# Altium PCB QCM_hardware_V2.PcbDoc
Units mm, origin at the board's own origin, x right, y up, seen from the top; angles counter-clockwise.
Board outline 160 x 100 mm, 2 copper layers (Top Layer, Bottom Layer), stack 0.78 mm thick; 94 components, 63 nets, 329 pads, 388 vias.
Unrouted connection lines stored in the file: 100.
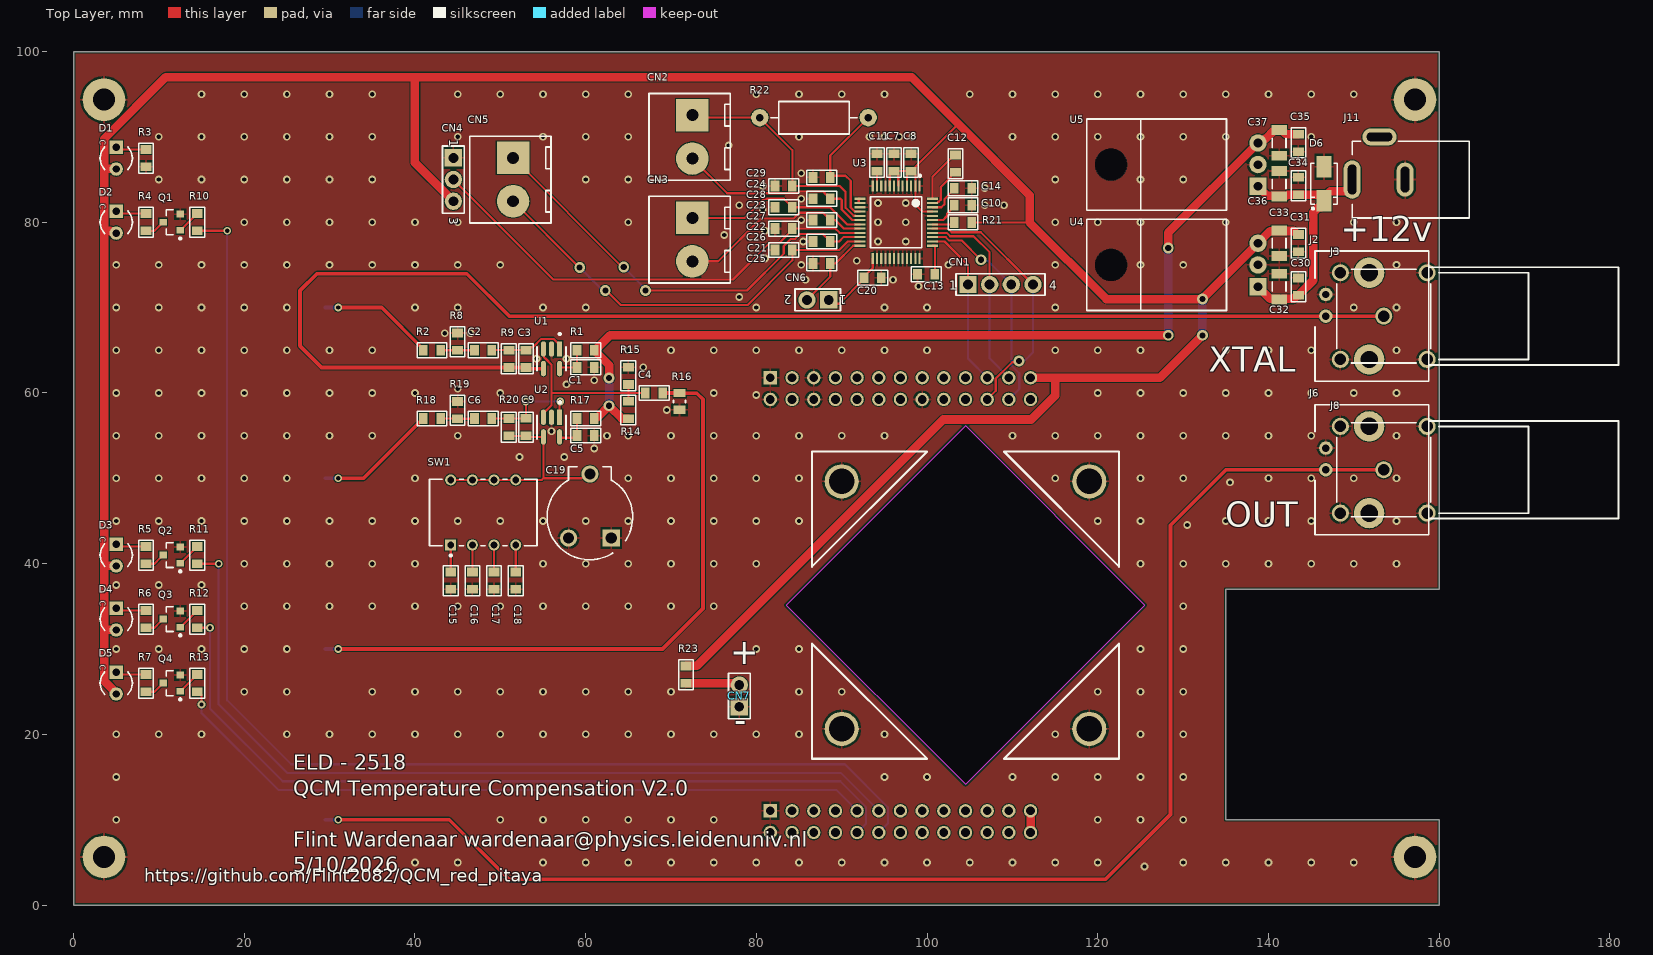
[diagram p0: Top Layer view]
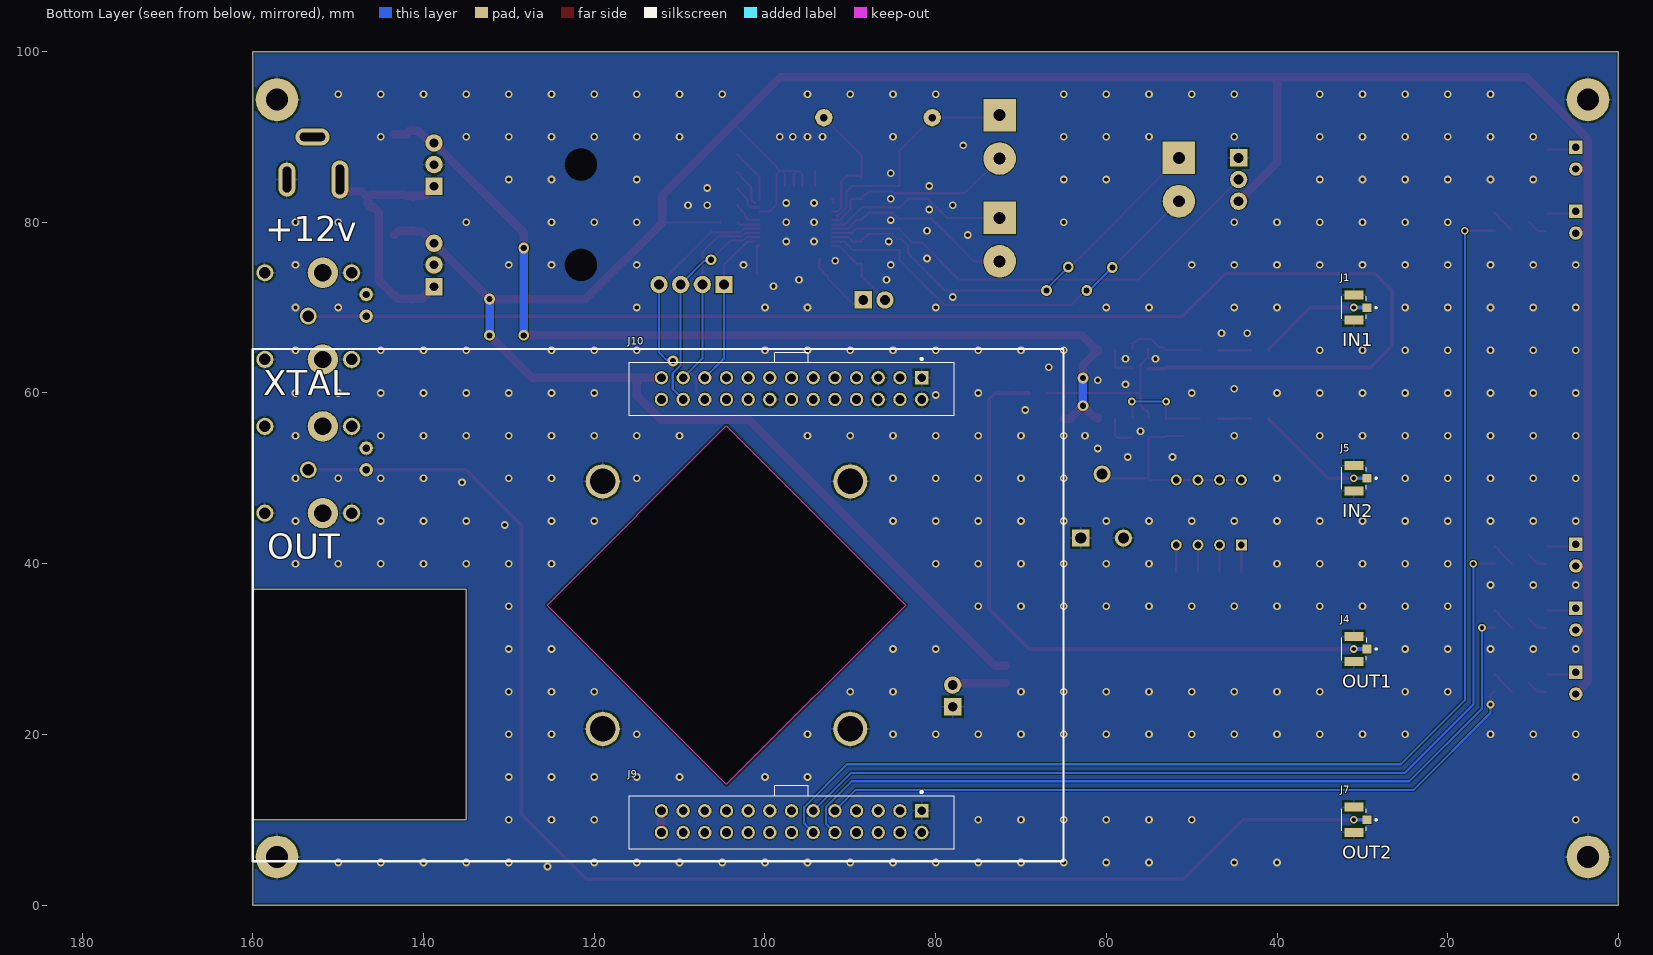
[diagram p1: Bottom Layer view, seen from below]
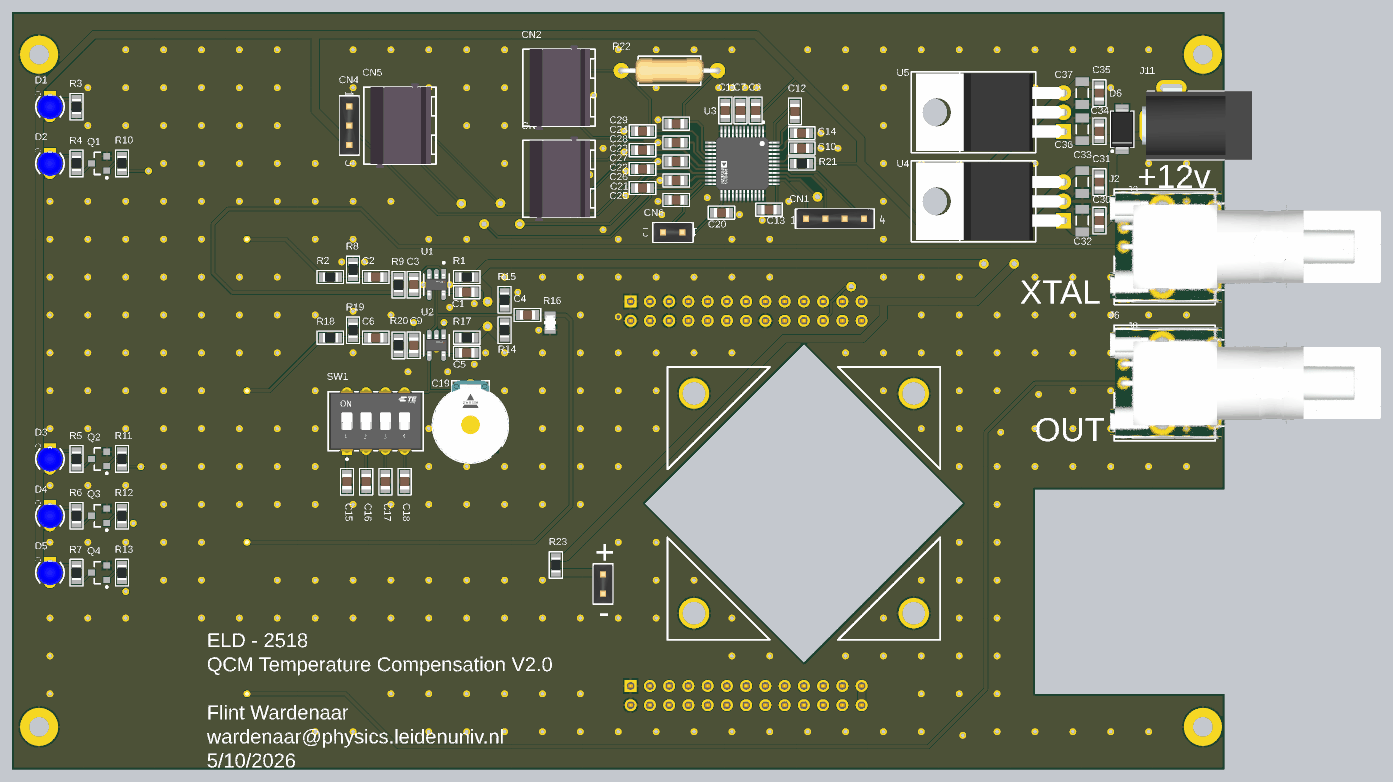
[diagram p2: 3D render of the assembled board from above, using the file's embedded part models]
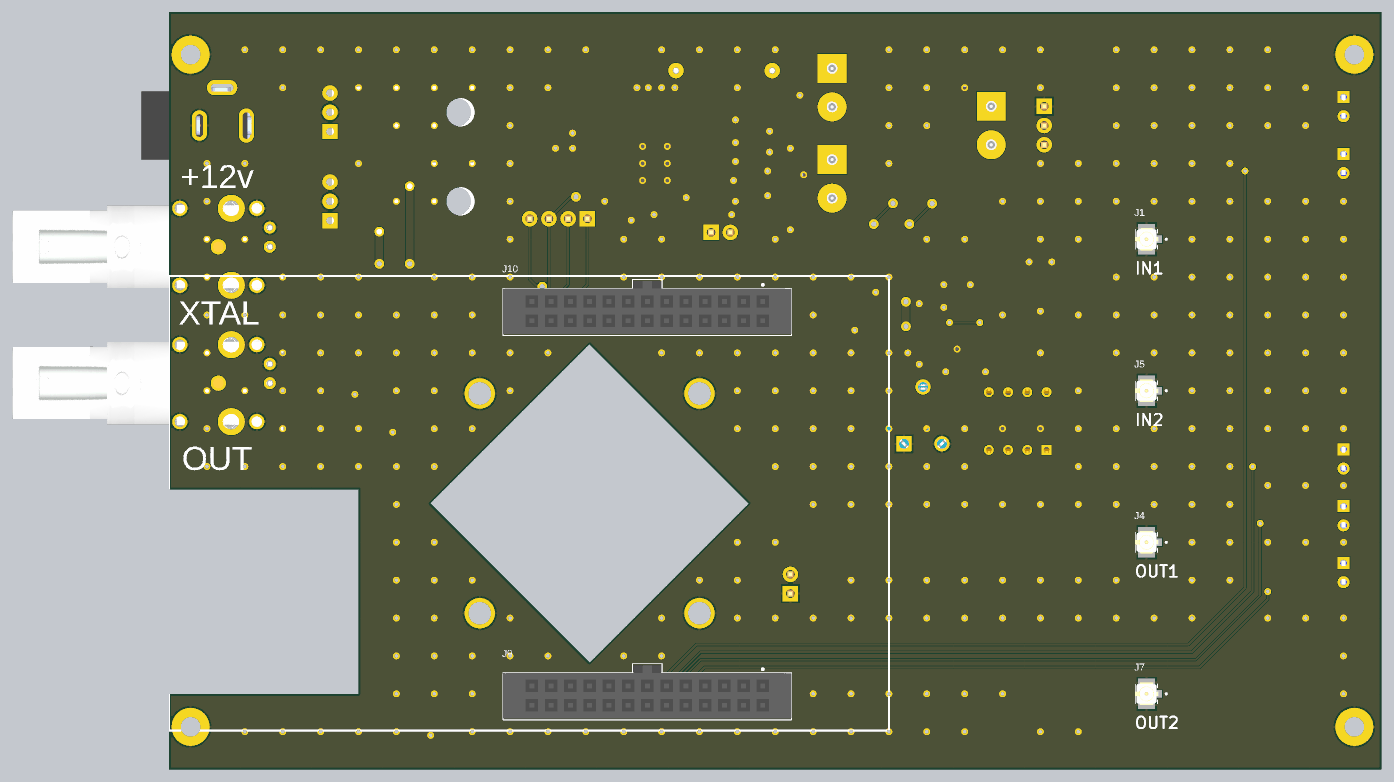
[diagram p3: 3D render of the assembled board from below, using the file's embedded part models]

## Layer stack, top to bottom
Top Solder: solder mask 0.01, Solder Resist, Dk 3.5
Top Layer: signal copper 0.035
Dielectric2: core 0.71, FR-4, Dk 4.3
Bottom Layer: signal copper 0.035
Bottom Solder: solder mask 0.01, Solder Resist, Dk 3.5

## Board outline
0,0 0,100 160,100 160,37 135,37 135,10 160,10 160,0
cut-out: 104.5,14.14 125.5,35.14 104.5,56.14 83.5,35.14

## Design rules (kind name [scope] priority, off if disabled: settings)
AssemblyTestPointUsage [All] p1 off:
AssemblyTestpoint [All] p1 off: testpointundercomponent=TRUE minsize=1.016 maxsize=2.54 preferedsize=1.524 minholesize=0 maxholesize=1.016 preferedholesize=0.813 testpointgrid=0.025 usegrid=TRUE gridtolerance=0 allowsidetop=TRUE allowsidebottom=TRUE
BoardOutlineClearance [All] p1: gap=0.25 ignorepadtopadclearanceinfootprint=FALSE except(0: Arc-SplitContinuation Track-SplitContinuation SMDPad-SplitContinuation THPad-SplitContinuation Via-SplitContinuation Fill-SplitContinuation Poly-SplitContinuation Region-SplitContinuation Text-SplitContinuation)
Clearance Clearance-xPP-xTP-xTT [All] p1: gap=0.1 ignorepadtopadclearanceinfootprint=TRUE except(0.01: Fill-Hole Poly-Hole Region-Hole Text-Hole; 0.2: Arc-Arc Arc-Track Arc-Hole Track-Track Track-Hole SMDPad-Hole THPad-Hole Via-Hole)
ComponentClearance Ignore_Shared_Connector_Collision [InComponent('J6') vs InComponent('J8')] p1 off: gap=0 collisioncheckmode=3 verticalgap=0 showdistances=FALSE
ComponentClearance [All] p2 off: gap=0.25 collisioncheckmode=3 verticalgap=0.25 showdistances=FALSE
DiffPairsRouting DiffPairs100Routing-BGA_Rooms [WithinRoom('BGA_Room_FPGA','BGA_Room_FX3','BGA_Room_ADC_Hotlink','BGA_Room_STM_Hotlink') And InNetClass('DIFF_100_PAIRS')] p1: maxlimit=0.127 minlimit=0.127 mostfreqgap=0.127 toplayer_minwidth=0.198 toplayer_maxwidth=0.198 toplayer_prefwidth=0.198 bottomlayer_minwidth=0.198 bottomlayer_maxwidth=0.198 bottomlayer_prefwidth=0.198 impedanceprofiledriven=TRUE maxuncoupledlength=12.7
DiffPairsRouting [All] p2: maxlimit=0.254 minlimit=0.254 mostfreqgap=0.254 toplayer_minwidth=0.381 toplayer_maxwidth=0.381 toplayer_prefwidth=0.381 bottomlayer_minwidth=0.381 bottomlayer_maxwidth=0.381 bottomlayer_prefwidth=0.381 maxuncoupledlength=12.7
DiffPairsRouting DiffPairs90Routing-BGA_Rooms [WithinRoom('BGA_Room_FX3') And InNetClass('DIFF_90_PAIRS')] p3: maxlimit=0.127 minlimit=0.127 mostfreqgap=0.127 toplayer_minwidth=0.198 toplayer_maxwidth=0.198 toplayer_prefwidth=0.198 bottomlayer_minwidth=0.198 bottomlayer_maxwidth=0.198 bottomlayer_prefwidth=0.198 maxuncoupledlength=12.7
DiffPairsRouting DiffPairs100Routing [InDifferentialPairClass('DIFF_PAIRS_100')] p4: maxlimit=0.127 minlimit=0.127 mostfreqgap=0.127 toplayer_minwidth=0.198 toplayer_maxwidth=0.198 toplayer_prefwidth=0.198 bottomlayer_minwidth=0.198 bottomlayer_maxwidth=0.198 bottomlayer_prefwidth=0.198 impedanceprofiledriven=TRUE maxuncoupledlength=12.5
DiffPairsRouting DiffPairs90Routing [InDifferentialPairClass('DIFF_PAIRS_90')] p5: maxlimit=0.127 minlimit=0.127 mostfreqgap=0.127 toplayer_minwidth=0.198 toplayer_maxwidth=0.198 toplayer_prefwidth=0.198 bottomlayer_minwidth=0.198 bottomlayer_maxwidth=0.198 bottomlayer_prefwidth=0.198 maxuncoupledlength=12.5
FabricationTestPointUsage [All] p1 off: valid=0 allowmultiple=FALSE
FabricationTestpoint [All] p1 off: side=3 testpointundercomponent=TRUE minsize=1.016 maxsize=2.54 preferedsize=1.524 minholesize=0 maxholesize=1.016 preferedholesize=0.813 testpointgrid=0.025 allowsidetop=TRUE allowsidebottom=TRUE usegrid=TRUE gridtolerance=0
Height [All] p1: minheight=0 maxheight=25 prefheight=12.5
HoleSize HoleSize-PTH [All] p2: absolutevalues=TRUE maxlimit=7 minlimit=0.15 maxpercent=80.000 minpercent=20.000
HoleToHoleClearance [All] p1: gap=0.35 allowstackedmicrovias=TRUE
MatchedLengths ADC_Hotlink_TX [InNetClass('Hotlink_ADCBUS_TX')] p1: tolerance=25.4 checknetsindiffpair=FALSE checkdiffpairvsdiffpair=TRUE checkxsignals=TRUE checkothers=TRUE usedelayunits=TRUE delaytolerance=150.000000
MatchedLengths STM_Hotlink_RX [InNetClass('Hotlnik_STMBUS_RX')] p2: tolerance=25.4 checknetsindiffpair=FALSE checkdiffpairvsdiffpair=TRUE checkxsignals=TRUE checkothers=TRUE usedelayunits=TRUE delaytolerance=150.000000
MatchedLengths STM_Hotlink_TX [InNetClass('Hotlink_STMBUS_TX')] p3: tolerance=25.4 checknetsindiffpair=FALSE checkdiffpairvsdiffpair=TRUE checkxsignals=TRUE checkothers=TRUE usedelayunits=TRUE delaytolerance=150.000000
MatchedLengths ADC_Hotlink_RX [InNetClass('Hotlink_ADCBUS_RX')] p4: tolerance=25.4 checknetsindiffpair=FALSE checkdiffpairvsdiffpair=TRUE checkxsignals=TRUE checkothers=TRUE usedelayunits=TRUE delaytolerance=150.000000
MatchedLengths MatchLengths_xSignals_U9_U6 [InxSignalClass('xSignals_U9_U6_MatchLengthsClass')] p5: tolerance=15 checknetsindiffpair=FALSE checkdiffpairvsdiffpair=TRUE checkxsignals=TRUE checkothers=TRUE targetsourcename="Not defined"
MatchedLengths SRAM_BUS [InNetClass('SRAM_BUS')] p6: tolerance=12.7 checknetsindiffpair=FALSE checkdiffpairvsdiffpair=TRUE checkxsignals=TRUE checkothers=TRUE usedelayunits=TRUE delaytolerance=75.000000 targetsourcename="Not defined"
MatchedLengths FX3_GPIF_BUS [InNetClass('FX3_GPIF_BUS')] p7: tolerance=12.7 checknetsindiffpair=FALSE checkdiffpairvsdiffpair=TRUE checkxsignals=TRUE checkothers=TRUE targetsourcename="Not defined"
MinimumAnnularRing "Minimum IAR  >0.24mm" [((ObjectKind = 'Pad') OR (ObjectKind = 'Via')) And (Layer = 'MultiLayer') And (HoleDiameter > AsMM(0.24))] p1: minimumring=0.125 // minimum inner annular ring for pads > 0.45mm finished hole size
MinimumAnnularRing "Minimum IAR <=0.24mm" [((ObjectKind = 'Pad') OR (ObjectKind = 'Via')) And (Layer = 'MultiLayer') And (HoleDiameter <= AsMM(0.24))] p2: minimumring=0.1 // minimum inner annular ring for pads <= 0.45mm finished hole size
MinimumSolderMaskSliver [All] p1: minsoldermaskwidth=0.08
PlaneClearance PlaneClearance-IPI [All] p2: clearance=0.25
PlaneConnect [All] p1: planeconnectstyle=Relief reliefexpansion=0.25 reliefentries=4 reliefconductorwidth=0.25 reliefairgap=0.25
PolygonConnect [All] p1: connectstyle=Relief reliefconductorwidth=0.254 reliefentries=4 polygonreliefangle="90 Angle" airgapwidth=0.254
PolygonConnect PolygonConnect-xTW [All] p2: thpad.connectstyle=Relief thpad.reliefconductorwidth=0.25 thpad.reliefentries=4 thpad.polygonreliefangle="90 Angle" thpad.airgapwidth=0.25 smdpad.connectstyle=Relief smdpad.reliefconductorwidth=0.25 smdpad.reliefentries=2 smdpad.polygonreliefangle="0 Angle" smdpad.airgapwidth=0.25 via.connectstyle=Relief via.reliefconductorwidth=0.25 via.reliefentries=4 via.polygonreliefangle="90 Angle" via.airgapwidth=0.25
RoutingCorners RoutingCorners_HighSpeed [InDifferentialPairClass('All Differential Pairs')] p1: cornerstyle=Round minsetback=2.54 maxsetback=2.54
RoutingCorners [All] p2: cornerstyle=Round minsetback=2.5 maxsetback=2.5
RoutingLayers RoutingLayers_DiffPairs [InDifferentialPairClass('All Differential Pairs')] p1: top layer_v5=TRUE bottom layer_v5=TRUE
RoutingLayers RoutingLayers_Power [InNetClass('POWER')] p2: top layer_v5=TRUE bottom layer_v5=TRUE
RoutingLayers [InNetClass('All Nets')] p3: top layer_v5=TRUE bottom layer_v5=TRUE
RoutingVias [All] p1: holewidth=0.711 width=1.27 viastyle="Through Hole" minholewidth=0.711 minwidth=1.27 maxholewidth=0.711 maxwidth=1.27
RoutingVias "Routing VIAs BGA_Rooms" [WithinRoom('BGA_Room_FPGA','BGA_Room_FX3','BGA_Room_ADC_Hotlink','BGA_Room_STM_Hotlink')] p2 off: holewidth=0.254 width=0.457 viastyle="Through Hole" minholewidth=0.254 minwidth=0.457 maxholewidth=0.254 maxwidth=0.457 useviatemplates=TRUE viatemplateguid#1={D2D23EF5-C6DB-44D0-AA98-324992E46AC0} viatemplatename#1=via_r45h10_mm
RoutingVias "Routing VIAs" [All] p3 off: holewidth=0.254 width=0.457 viastyle="Through Hole" minholewidth=0.254 minwidth=0.457 maxholewidth=0.762 maxwidth=1.575 useviatemplates=TRUE viatemplateguid#1={93411B78-2348-4F15-A81C-0014E3455A4D} viatemplateguid#2={6A946846-BB7C-48EE-9F70-67F61FD11D76} viatemplatename#1=via_r50h15_mm viatemplatename#2=via_r90h50_mm // Standard VIAs
SMDNeckDown [All] p1: percent=100.000
SilkToSilkClearance [All] p1: silktosilkclearance=0.05
SilkToSolderMaskClearance SilkscreenOverComponentPads [IsPad] p2: minsilkscreentomaskgap=0.1 clearancetoexposedcopper=TRUE
SolderMaskExpansion [All] p1: expansion=0 istentingtop=FALSE
SupplyNets "Schematic Supply Nets_5" [InNet('+12')] p1: voltage=0.000
SupplyNets "Schematic Supply Nets_4" [InNet('GND')] p2: voltage=0.000
SupplyNets "Schematic Supply Nets_3" [InNet('-4v')] p3: voltage=0.000
SupplyNets "Schematic Supply Nets_2" [InNet('3v3')] p4: voltage=0.000
SupplyNets "Schematic Supply Nets_1" [InNet('+5')] p5: voltage=0.000
SupplyNets "Schematic Supply Nets" [InNet('+9')] p6: voltage=0.000
UnRoutedNet [All] p1: checkbadconnections=TRUE
Width Width-BGA_Rooms [WithinRoom('BGA_Room_FPGA','BGA_Room_FX3','BGA_Room_ADC_Hotlink','BGA_Room_STM_Hotlink')] p1: maxlimit=0.5 minlimit=0.1 preferedwidth=0.1
Width Width-Power [InNetClass('Power')] p2: maxlimit=10 minlimit=0.254 preferedwidth=1 minimp=50.000000 maximp=50.000000 favimp=50.000000
Width Width-50ohm [InNetClass('50ohm')] p3: maxlimit=0.5 minlimit=0.406 preferedwidth=0.433 bottomlayer_minwidth=0.406 minimp=50.000000 maximp=50.000000 favimp=50.000000
Width [All] p4: maxlimit=1 minlimit=0.254 preferedwidth=0.254 minimp=50.000000 maximp=50.000000 favimp=50.000000
Width Width-xTW [All] p5: maxlimit=0.2 minlimit=0.15 preferedwidth=0.15
16 further rules are at their usual default settings.

## Classes and differential pairs
net class 50ohm: NetC3_2 NetC4_1 NetJ1_1 NetJ5_1 NetJ6_1
net class Power: 3v3 +5 +9 +12 -4v GND

## Components (designator, comment, footprint, x,y, rotation, side; value= is the part's Value field where it differs from the comment)
C1 "100nF" C_0805 60,63 r0 top
C2 "100nF" C_0805 48,65 r180 top
C3 "330p" C_0805 53,64 r270 top
C4 "22uF" C_0805 68.016,60 r180 top
C5 "100nF" C_0805 60,55 r0 top
C6 "100nF" C_0805 48,57 r180 top
C7 "10uF" C_0805 96.13,87 r90 top
C8 "0.1uF" C_0805 98.13,87 r90 top
C9 "330p" C_0805 53,56 r270 top
C10 "10uF" C_0805 104.207,81.984 r0 top
C11 "10uF" C_0805 94.13,87 r270 top
C12 "10uF" C_0805 103.315,86.868 r270 top
C13 "10uF" C_0805 99.9,73.9 r0 top
C14 "10uF" C_0805 104.207,83.984 r0 top
C15 "180pF" C_0805 44.19,38 r270 top
C16 "100pf" C_0805 46.73,38 r270 top
C17 "47pF" C_0805 49.27,38 r270 top
C18 "22pF" C_0805 51.81,38 r270 top
C19 "0-33pF" FP-BFC280832659-MFG 60.5,45.5 r180 top value=5.5-65pF
C20 "0.1uF" C_0805 93.63,73.5 r0 top
C21 "0.1uF" C_0805 83.2,76.75 r180 top
C22 "0.1uF" C_0805 83.2,79.25 r180 top
C23 "0.1uF" C_0805 83.2,81.75 r180 top
C24 "0.1uF" C_0805 83.2,84.25 r180 top
C25 "0.1uF" C_0805 87.645,75.17 r180 top
C26 "0.1uF" C_0805 87.645,77.75 r180 top
C27 "0.1uF" C_0805 87.645,80.25 r180 top
C28 "0.1uF" C_0805 87.645,82.75 r180 top
C29 "0.1uF" C_0805 87.645,85.25 r180 top
C30 "100pF" C_0805 143.5,72.46 r270 top
C31 "100pF" C_0805 143.5,77.54 r90 top
C32 "100nF" CAPC1206(3216)170_N 141.25,72.46 r270 top value=68nF
C33 "100nF" CAPC1206(3216)170_N 141.25,77.54 r90 top value=68nF
C34 "100pF" C_0805 143.5,84.25 r270 top
C35 "100pF" C_0805 143.5,89.29 r90 top
C36 "100nF" CAPC1206(3216)170_N 141.25,84.5 r270 top value=68nF
C37 "100nF" CAPC1206(3216)170_N 141.25,89.29 r90 top value=68nF
CN1 "SPI" HDR4 108.6,72.7 r0 top
CN2 "RTD-" TERMINAL_BLOCK2 72.5,90 r270 top
CN3 "RTD+" TERMINAL_BLOCK2 72.5,77.96 r270 top
CN4 "TSic 501F" HDR3 44.5,85 r270 top
CN5 "THERMOCOUPLE" TERMINAL_BLOCK2 51.5,85 r270 top
CN6 "SPARE" HDR2 87.2,70.9 r180 top
CN7 "FAN" HDR2 78,24.5 r90 top
D1 "LED_BLUE" LED_3MM_BLUE 5,87.5 r270 top
D2 "LED_BLUE" LED_3MM_BLUE 5,80 r270 top
D3 "LED_BLUE" LED_3MM_BLUE 5,41 r270 top
D4 "LED_BLUE" LED_3MM_BLUE 5,33.5 r270 top
D5 "LED_BLUE" LED_3MM_BLUE 5,26 r270 top
D6 "DIODE_TVS" DIODE_SMA 146.5,84.5 r90 top
J1 "IN1" UFL_JACK_SM 31,70 r90 bottom
J2 "BNC_ELBOW2" BNC_ELBOW2 149.25,69 r270 top
J3 "60711002241505" 60711002241505 153.5,69 r0 top
J4 "OUT1" UFL_JACK_SM 31,30 r90 bottom
J5 "IN2" UFL_JACK_SM 31,50 r90 bottom
J6 "BNC_ELBOW2" BNC_ELBOW2 149.25,51 r270 top
J7 "OUT2" UFL_JACK_SM 31,10 r90 bottom
J8 "60711002241505" 60711002241505 153.5,51 r0 top
J9 "SFH11-PBPC-D13-ST-BK" SFH11-PBPC-D13-ST-BK_MFG 96.88,9.77 r0 bottom
J10 "SFH11-PBPC-D13-ST-BK" SFH11-PBPC-D13-ST-BK_MFG 96.88,60.51 r0 bottom
J11 "KLDX-0202-B" KYCN-KLDX-0202-B_V 163.5,85 r180 top
Q1 "MGSF1N03LT1G" ONSC-SOT-23-3-318-08_V 11.5,80 r180 top
Q2 "MGSF1N03LT1G" ONSC-SOT-23-3-318-08_V 11.5,41 r180 top
Q3 "MGSF1N03LT1G" ONSC-SOT-23-3-318-08_V 11.5,33.5 r180 top
Q4 "MGSF1N03LT1G" ONSC-SOT-23-3-318-08_V 11.5,26 r180 top
R1 "10" R_0805 60,65 r180 top
R2 "50" R_0805 42,65 r180 top
R3 "220" R_0805 8.5,87.5 r270 top
R4 "220" R_0805 8.5,80 r270 top
R5 "220" R_0805 8.5,41 r270 top
R6 "220" R_0805 8.5,33.5 r270 top
R7 "220" R_0805 8.5,26 r270 top
R8 "100k" R_0805 45,66 r90 top
R9 "390k" R_0805 51,64 r90 top
R10 "1k" R_0805 14.5,80 r90 top
R11 "1k" R_0805 14.5,41 r90 top
R12 "1k" R_0805 14.5,33.5 r90 top
R13 "1k" R_0805 14.5,26 r90 top
R14 "10k" R_0805 65,58 r90 top
R15 "10k" R_0805 65,62 r90 top
R16 "CRCW080550R0FKTA" FP-D12-CRCW0805-MFG 71,59 r90 top
R17 "10" R_0805 60,57 r180 top
R18 "50" R_0805 42,57 r180 top
R19 "100k" R_0805 45,57.984 r90 top
R20 "390k" R_0805 51,55.984 r90 top
R21 "0" R_0805 104.207,79.984 r180 top
R22 "R_SENSE" R_AXIAL_9.0x3.2mm_p12.7mm 86.75,92.25 r0 top
R23 "0" R_0805 71.766,27 r90 top
SW1 "1825360-3" FP-1825360-3-MFG 48,46 r0 top
U1 "OPA656NB/250" FP-DBV0005A-IPC_A 56,64 r270 top
U2 "OPA656NB/250" FP-DBV0005A-IPC_A 56,56 r270 top
U3 "LTC2986ILX-1#PBF" FP-LX-48-05-08-1760-MFG 96.38,80 r270 top
U4 "Recom R-78K5.0-2.0L" TO220H 130.25,75 r180 top
U5 "7809" TO220H 130.25,86.75 r180 top

## Footprints (in the part's own frame and the unit in brackets; to place one, negate y for a bottom-side part, rotate by r counter-clockwise, add the part's x,y. Pads: shape width x height; smd on the part's side, far side on the other; paste and mask are expansions set on the pad)
60711002241505 [mm]
  round 2 hole 1.35: 1(0,0) 2(-5.08,5.08) 3(5.08,5.08) 4(5.08,-5.08) 5(-5.08,-5.08)
  silkscreen extent -5.5,-5.5 16.96,5.5, body extent -5.5,-5.5 16.96,5.5, height 18.7
BNC_ELBOW2 [mil]
  round 62 hole 34: 1(0,-100) 2(-100,-100)
  round 140 hole 80: " "(-200,100) " "(200,100)
  silkscreen extent -300,-150 300,1250, body extent -291,-171 291,1237, height 634
C_0805 [mil]
  rect 40x50 smd: 1(-40,0) 2(40,0)
  silkscreen extent -69,-34 69,34, body extent -39,-25 39,25, height 49
CAPC1206(3216)170_N [mm] "Chip Capacitor, Body 3.2x1.6mm, Height 1.7mm, IPC Medium Density"
  rect 1.15x1.8 smd: 1(-1.5,0) 2(1.5,0)
  silkscreen extent -0.55,-0.8 0.55,0.8, body extent -1.7,-0.9 1.7,0.9, height 1.7
DIODE_SMA [mm] "DO-214AC Diode"
  rect 2.5x1.7 smd: A(2,0) C(-2,0)
  silkscreen extent -3.02,-1.55 2.4,1.55, body extent -2.8,-1.48 2.8,1.48, height 2.7
FP-1825360-3-MFG [mm]
  rect 1.29x1.29 hole 0.79 paste-2539.97 mask+0: 1(-3.81,-3.81)
  round 1.29 hole 0.79 paste-2539.97 mask+0: 2(-1.27,-3.81) 3(1.27,-3.81) 4(3.81,-3.81) 5(3.81,3.81) 6(1.27,3.81) 7(-1.27,3.81) 8(-3.81,3.81)
  silkscreen extent -6.29,-5.16 6.3,3.9, body extent -6.4,-4.55 6.4,4.55, height 0.25
FP-BFC280832659-MFG [mm]
  rect 2x2 hole 1.3 paste-2539.97 mask+0: 1(-2.5,2.5)
  round 2 hole 1.3 paste-2539.97 mask+0: 2(2.5,2.5) 3(0,-5)
  silkscreen extent -5.01,-5.85 5.02,5.04, body extent -5.4,-6.1 5.4,5.2, height 0.25
FP-D12-CRCW0805-MFG [mm]
  rect 0.95x1.45 smd paste+0 mask+0: 1(-0.975,0) 2(0.975,0)
  silkscreen extent -0.13,-0.7 0.13,0.7, body extent -1.55,-0.82 1.55,0.82, height 0.25
FP-DBV0005A-IPC_A [mm]
  rect 1.805x0.612 smd paste+0 mask+0: 1(-1.15,0.95)
  rrect100% 1.805x0.612 smd paste+0 mask+0: 2(-1.15,0) 3(-1.15,-0.95) 4(1.15,-0.95) 5(1.15,0.95)
  silkscreen extent -3.03,-1.7 1.4,1.7, body extent -2.55,-1.95 2.55,1.95, height 0.25
FP-LX-48-05-08-1760-MFG [mm]
  rect 1.3x0.25 smd paste+0 mask+0: 1(-4.25,2.75) 2(-4.25,2.25) 3(-4.25,1.75) 4(-4.25,1.25) 5(-4.25,0.75) 6(-4.25,0.25) 7(-4.25,-0.25) 8(-4.25,-0.75) 9(-4.25,-1.25) 10(-4.25,-1.75) 11(-4.25,-2.25) 12(-4.25,-2.75) 25(4.25,-2.75) 26(4.25,-2.25) 27(4.25,-1.75) 28(4.25,-1.25) 29(4.25,-0.75) 30(4.25,-0.25) 31(4.25,0.25) 32(4.25,0.75) 33(4.25,1.25) 34(4.25,1.75) 35(4.25,2.25) 36(4.25,2.75)
  rect 0.25x1.3 smd paste+0 mask+0: 13(-2.75,-4.25) 14(-2.25,-4.25) 15(-1.75,-4.25) 16(-1.25,-4.25) 17(-0.75,-4.25) 18(-0.25,-4.25) 19(0.25,-4.25) 20(0.75,-4.25) 21(1.25,-4.25) 22(1.75,-4.25) 23(2.25,-4.25) 24(2.75,-4.25) 37(2.75,4.25) 38(2.25,4.25) 39(1.75,4.25) 40(1.25,4.25) 41(0.75,4.25) 42(0.25,4.25) 43(-0.25,4.25) 44(-0.75,4.25) 45(-1.25,4.25) 46(-1.75,4.25) 47(-2.25,4.25) 48(-2.75,4.25)
  silkscreen extent -5.57,-3 3,3, body extent -4.5,-4.5 4.5,4.5, height 1.6
HDR2 [mil] "2-Pin 1-Row Header With 2.54mm pitch"
  rect 80x80 hole 45.28: 1(-50,0)
  round 80 hole 45.28: 2(50,0)
  silkscreen extent -105,-50 105,50, body extent -101,-50 101,50, height 323
HDR3 [mil] "3-Pin 1-Row Header With 2.54mm pitch"
  rect 80x80 hole 45.28: 1(-100,0)
  round 80 hole 45.28: 2(0,0) 3(100,0)
  silkscreen extent -155,-50 155,50, body extent -150,-50 150,50, height 323
HDR4 [mil] "4-Pin 1-Row Header With 2.54mm pitch"
  rect 80x80 hole 45.28: 1(-150,0)
  round 80 hole 45.28: 2(-50,0) 3(50,0) 4(150,0)
  silkscreen extent -205,-50 205,50, body extent -200,-50 200,50, height 323
KYCN-KLDX-0202-B_V [mm] "3 Conductor Jack, 9 x 14.5 mm Body"
  oval 2x4.5 hole 1 slot 3.5 at 90 deg: 1(13.7,0)
  oval 2x4 hole 1 slot 3 at 90 deg: 2(7.5,0)
  oval 4x2 hole 1 slot 3 at 0 deg: 3(10.5,-5)
  silkscreen extent 0,-4.5 13.7,4.5, body extent -0.15,-5 14.35,4.5, height 11
LED_3MM_BLUE [mil] "Blue 3MM LED"
  round 62 hole 34: A(50,0)
  rect 62x62 hole 34: C(-50,0)
  silkscreen extent -53,-75 53,75, body extent -61,-65 66,65, height 196
ONSC-SOT-23-3-318-08_V [mm] "SOT23, 3-Leads, Body 2.92x1.3mm, Pitch 0.95mm"
  rect 0.9x0.8 smd: 1(-1,0.95) 2(-1,-0.95) 3(1,0)
  silkscreen extent -1.13,-1.46 0.65,2.02, body extent -0.65,-1.46 0.65,1.46, height 1.11
R_0805 [mil] "R 0805"
  rect 40x50 smd: 1(-40,0) 2(40,0)
  silkscreen extent -69,-34 69,34, body extent -39,-24 39,24, height 18
R_AXIAL_9.0x3.2mm_p12.7mm [mil]
  round 80 hole 34: 1(-250,0) 2(250,0)
  silkscreen extent -200,-75 200,75, body extent -263,-63 264,63, height 126
SFH11-PBPC-D13-ST-BK_MFG [mm] "Recommended Land Pattern"
  rect 1.57x1.57 hole 1.02 paste-2539.97 mask+0: 1(-15.24,-1.27)
  round 1.57 hole 1.02 paste-2539.97 mask+0: 2(-15.24,1.27) 3(-12.7,-1.27) 4(-12.7,1.27) 5(-10.16,-1.27) 6(-10.16,1.27) 7(-7.62,-1.27) 8(-7.62,1.27) 9(-5.08,-1.27) 10(-5.08,1.27) 11(-2.54,-1.27) 12(-2.54,1.27) 13(0,-1.27) 14(0,1.27) 15(2.54,-1.27) 16(2.54,1.27) 17(5.08,-1.27) 18(5.08,1.27) 19(7.62,-1.27) 20(7.62,1.27) 21(10.16,-1.27) 22(10.16,1.27) 23(12.7,-1.27) 24(12.7,1.27) 25(15.24,-1.27) 26(15.24,1.27)
  silkscreen extent -19.05,-4.2 19.05,3.2, body extent -19.05,-4 19.05,3, height 8.7
TERMINAL_BLOCK2 [mil] "TERMINAL_BLOCK2"
  rect 150x150 hole 55: 1(-100,0)
  round 150 hole 55: 2(100,0)
  silkscreen extent -200,-200 200,175, body extent -220,-165 220,150, height 394
TO220H [mil] "TO220H"
  rect 80x80 hole 40: 1(-335,100)
  round 80 hole 40: 2(-335,0) 3(-335,-100)
  round 0 hole 147 unplated: " "(342.52,0)
  silkscreen extent -190,-210 455,210, body extent -345,-202 432,202, height 175
UFL_JACK_SM [mm]
  rect 1x1.05 smd: 1(0,-1.525)
  rect 1.05x2.2 smd: 2(-1.475,0) 3(1.475,0)
  silkscreen extent -1.3,-2.7 1.3,1.42, body extent -1.5,-1.55 1.5,1.55, height 1.3

## Part data
C1 C2 C3 C4 C5 C6 C7 C8 C9 C10 C11 C12 C13 C14 C15 C16 C17 C18 C20 C21 C22 C23 C24 C25 C26 C27 C28 C29 C30 C31 C34 C35: library part C_0805
C19: library part CMP-02422-000001-1, "CAP TRIMMER 5.5-65PF 150V TH", Capacitance=5.5-65pF, Manufacturer="Vishay BC Components", Manufacturer Part Number=BFC280832659, Temperature="-40°C to +70°C", Temperature Coefficient=+300/-700ppm/°C, Temperature Range High=+70°C, Temperature Range Low=-40°C, Voltage Rating=150V, Automotive=No, Category=Cap, ComponentLink2Description=Datasheet, ComponentLink2URL=https://www.vishay.com/docs/28528/bfc2808-10mm.pdf, Device Class L1="Passive Components", Device Class L2=Capacitors, Device Class L3="Trimmer / Variable Capacitors", Digikey Description="CAP TRIMMER 5.5-65PF 150V TH", Height=11mm, Lead Free=Yes, Material=Polypropylene, Mouser Description="Trimmer / Variable Capacitors TRIMMER CAPACITOR", Octopart=https://octopart.com/bfc280832659-vishay-41937824, Package=BFC280832659, RoHS=TRUE
C32 C33 C36 C37: library part CMP-1037-04098-1, "CAP 68nF 100V ±5% 1206 (3216 Metric) Thickness 1.7mm SMD", Case-EIA=1206, Case-Metric=3216, Rated Voltage="100 V", Tolerance=Â±5%, Max Thickness="1.7 mm", Technology=SMT
CN1: library part HDR4
CN2 CN3 CN5: library part TERMINAL_BLOCK2
CN4: library part HDR3
CN6 CN7: library part HDR2
J1 J4 J5 J7: library part UFL_JACK_SM, "U.FL (UMCC) Connector Jack, Male Pin 50Ohm Surface Mount Solder", Package=None, Availability=Unavailable, Check_prices=https://www.snapeda.com/parts/CONUFL001-SMD-T/Linx/view-part/?ref=eda, MF=Linx, MP=CONUFL001-SMD-T, Price=None, SnapEDA_Link=https://www.snapeda.com/parts/CONUFL001-SMD-T/Linx/view-part/?ref=snap
J3 J8: library part CMP-03913-162524349-1, "Rf Conn, Bnc, R/a Jack, 50 Ohm, Tht Rohs Compliant: Yes"
J9 J10: library part CMP-00595-18674420-1, "Conn Socket Strip F 26 POS 2.54mm Solder ST Thru-Hole", Color=Black, Contact Resistance=20mΩ, Current Rating=3A, Insulation Resistance=1GΩ, Max Operating Temperature=105°C, Min Operating Temperature=-40°C, ComponentLink2Description="Datasheet URL", ComponentLink2URL=https://drawings-pdf.s3.amazonaws.com/11160.pdf, Connector Type="Header, Socket", Contact Gender=Female, Contact Plating=Gold, HelpURL=https://drawings-pdf.s3.amazonaws.com/11160.pdf, Introduction Date=2011-09-15, Lead Free="Lead Free", Lifecycle Status=Production, Mount="Through Hole", Number of Pins=26, Number of Positions=26, Number of Rows=2, Pitch=2.54mm, REACH SVHC=Yes, RoHS=Compliant, Row Spacing=2.54mm, Terminal Pitch=2.54mm, Termination=Solder
J11: library part CMP-0256-00001-1, "3 Conductor Power Jack, 2 break 2 aux contacts", ComponentLink1Description="Manufacturer URL", ComponentLink1URL=http://kycon.com/, ComponentLink2Description=Datasheet, ComponentLink2URL=http://anacapa.kycon.com/Catalog_PDF/KLDX_0202.pdf, Contact Finish=Brass, Mounting Technology="Through Hole", PackageDescription="Jack, 9 x 14.5 mm Body, 2.5 mm Center Pin Diameter", PackageReference=KLDX-0202-B, PartNumber=KLDX-0202-B
Q1 Q2 Q3 Q4: library part CMP-1058-00778-1, "Power MOSFET, 30 V, 2.1 A, Single N-Channel, 3-Pin SOT-23, Pb-Free, Tape and Reel", Manufacturer="On Semiconductor", Package Type=SOT-23-3, Channel Polarity="N Channel", Ciss Typ (pF)=140, ComponentLink1Description="Manufacturer URL", ComponentLink1URL=http://www.onsemi.com/, ComponentLink2Description=Datasheet, ComponentLink2URL=http://www.onsemi.cn/pub_link/Collateral/MGSF1N03LT1-D.PDF, ComponentLink3Description="Package Specification", ComponentLink3URL=http://www.onsemi.cn/pub_link/Collateral/318-08.PDF, Configuration=Single, Coss Typ (pF)=100, Crss Typ (pF)=40, DatasheetVersion="Rev. 10", ID Max (A)=2.1, Mounting Technology="Surface Mount", PackageDescription="3-Pin Small Outline Transistor, Body 2.92 x 1.3 mm, Pitch 0.95 mm", PackageReference=SOT-23-3-318-08, PackageVersion="Rev. AP, 11/2009", Packing="Tape and Reel", PartNumber=MGSF1N03LT1G, RoHS=Pb-Free, V(BR)DSS Min (V)=30, VGS Max (V)=20, VGS(th) Max (V)=2.4
R1 R2 R3 R4 R5 R6 R7 R8 R9 R10 R11 R12 R13 R14 R15 R17 R18 R19 R20 R21 R23: library part R_0805
R16: library part CMP-00030-21390498-1, "CRCW080550R0FKTA Res Thick Film 0805 50 Ohm 1% 0.125W(1/8W) ±100ppm/C Pad SMD Automotive T/R", Case Code (Imperial)=0805, Case Code (Metric)=2012, Max Operating Temperature=155°C, Min Operating Temperature=-55°C, Power Rating=125mW, Resistance=50Ω, Temperature Coefficient=100ppm/°C, Tolerance=1%, Voltage Rating=150V, Case/Package=0805, Composition="Thick Film", Contact Plating="Lead, Tin", Height=450µm, Lead Free="Contains Lead", Length=2mm, NexarPartId=21390498, RoHS=Non-Compliant, Weight=5.499807mg, Width=1.25mm
R22: library part R_1W, "Throughhole resistor with a 12.7mm pitch (Standard 1W metalfilm/carbon)"
SW1: library part CMP-03400-000022-1, "SWITCH SLIDE DIP SPST 100MA 24V", Contact Current Rating=1A, Contact Resistance=50mR, Flammability Rating="UL94 V-0", Housing Color=Black, Max Current Rating=100mA, Max Operating Temperature=85°C, Max Voltage Rating (DC)=24V, Min Operating Temperature=-30°C, Package Quantity=35, Voltage Rating (DC)=5V, Actuator Length=0.99mm, Actuator Material=Polybutylene, Actuator Type=Standard, Contact Material="Copper Alloy", Contact Plating=Gold, Contact Post Length=4mm, Depth=7.49mm, Electrical Life=1000Cycles, ELV=Compliant, Height=0.138inch, Housing Material=Polyphenylene, Lead Free="Lead Free", Length=0.476inch, Mount="Through Hole", Number of Circuits=4, Number of Positions=4, Orientation=Straight, Packaging=Rail/Tube, Pitch=0.1inch, Radiation Hardening=No, RoHS Compliant=Yes, Sealable="No (Without)", Series=ADE, Terminal Pitch=2.54mm, Termination="PC Pins", Throw Configuration=SPST, Type=Switch, Washable=Yes
U1 U2: library part CMP-0018-00414-3, "IC OPAMP VFB 1 CIRCUIT SOT23-5", Case/Package=SOT-23, Dual Supply Voltage=5V, Input Bias Current=20pA, Input Offset Voltage (Vos)=600uV, Max Dual Supply Voltage=6V, Max Operating Temperature=85°C, Max Supply Voltage=12V, Min Operating Temperature=-40°C, Min Supply Voltage=10V, Nominal Supply Current=16mA, Package Quantity=250, Power Supply Rejection Ratio (PSRR)=74dB, Bandwidth=230MHz, Common Mode Rejection Ratio=88dB, Gain Bandwidth Product=230MHz, Height=1.15mm, Lead Free="Lead Free", Length=2.9mm, Max I/O Voltage=600uV, Number of Amplifiers=1, Number of Channels=1, Number of Circuits=1, Number of Elements=1, Number of Pins=5, Operating Supply Voltage=12V, Packaging="Tape and Reel", Radiation Hardening=No, REACH SVHC="No SVHC", Settling Time=16ns, Slew Rate=290V/µs, Unity Gain Bandwidth Product=230MHz, Width=1.6mm
U3: library part CMP-09131-000069-1, "IC SENSOR TEMP MEASUREMNT 48LQFP", Case/Package=LQFP, Max Supply Voltage=5.25V, Min Operating Temperature=-40°C, Min Supply Voltage=2.85V, Supplier Part Number 1="TSIC 501F TO92", Number of Pins=48, REACH SVHC="No SVHC", RoHS Compliant=Yes, Supplier 1=Farnell
U4: library part 7809, "Standard +9V 1A positive fixed voltage regulator in TO-220 housing", Case/Package=TO, Dropout Voltage=2V, Manufacturer 1=STMicroelectronics, Manufacturer Part Number 1=L7809CV, Max Input Voltage=35V, Max Operating Temperature=125°C, Max Output Current=1.5A, Min Input Voltage=11V, Min Operating Temperature=0°C, Min Output Voltage=9V, Package Quantity=50, Power Supply Rejection Ratio (PSRR)=55dB, Quiescent Current=8mA, Supplier Part Number 1=511-L7809CV, Tolerance=5%, Accuracy=2%, ComponentLink1Description=http://www.jameco.com/Jameco/Products/ProdDS/902071.pdf, ComponentLink1URL=http://www.jameco.com/Jameco/Products/ProdDS/902071.pdf, ComponentLink2Description=http://www.ti.com/lit/ds/symlink/lm7805c.pdf, ComponentLink2URL=http://www.ti.com/lit/ds/symlink/lm7805c.pdf, ComponentLink3Description=http://www.ti.com/general/docs/lit/getliterature.tsp?genericPartNumber=LM7815C&&fileType=pdf, ComponentLink3URL=http://www.ti.com/general/docs/lit/getliterature.tsp?genericPartNumber=LM7815C&&fileType=pdf, ComponentLink4Description=https://datasheet.ciiva.com/27055/1991694-27055797.pdf?src-supplier=Jameco, ComponentLink4URL=https://datasheet.ciiva.com/27055/1991694-27055797.pdf?src-supplier=Jameco, ComponentLink5Description=https://datasheet.ciiva.com/26331/179191-da-01-en-spannungsregler-l7809cv-to-220-stm-26331022.pdf?src-supplier=Conrad, ComponentLink5URL=https://datasheet.ciiva.com/26331/179191-da-01-en-spannungsregler-l7809cv-to-220-stm-26331022.pdf?src-supplier=Conrad, ComponentLink6Description=https://datasheet.ciiva.com/1511/1805459-1511921.pdf?src-supplier=Element14, ComponentLink6URL=https://datasheet.ciiva.com/1511/1805459-1511921.pdf?src-supplier=Element14, ComponentLink7Description=https://datasheet.ciiva.com/2044/cd00000444-2044161.pdf?src-supplier=Digi-Key, ComponentLink7URL=https://datasheet.ciiva.com/2044/cd00000444-2044161.pdf?src-supplier=Digi-Key, ComponentLink8Description=https://datasheet.ciiva.com/16393/cd00000444-16393733.pdf?src-supplier=Future+Electronics, ComponentLink8URL=https://datasheet.ciiva.com/16393/cd00000444-16393733.pdf?src-supplier=Future+Electronics, ComponentLink9Description=https://datasheet.ciiva.com/3224/cd00000444-3224953.pdf?src-supplier=Avnet, ComponentLink9URL=https://datasheet.ciiva.com/3224/cd00000444-3224953.pdf?src-supplier=Avnet, ComponentLink10Description=https://datasheet.ciiva.com/18404/70013895-18404043.pdf?src-supplier=Allied+Electronics, ComponentLink10URL=https://datasheet.ciiva.com/18404/70013895-18404043.pdf?src-supplier=Allied+Electronics, Description 1="STMICROELECTRONICS - L7809CV - IC, V REG +9.0V, 7809, TO-220-3", Height=14.9mm, Lead Free="Lead Free", Length=10.4mm, Mount="Through Hole", Nominal Output Voltage=9V, Number of Outputs=1, Number of Pins=3, Number of Regulators=1, Output Configuration=Positive, Output Current=1.5A, Output Type=Fixed,Adjustable, Output Voltage=9V, Packaging=Rail/Tube, Polarity=Positive, Pricing="1=0.45, 10=0.374, 50=0.374, 100=0.228, 1000=0.176, 2000=0.15, 10000=0.14, 25000=0.133, 50000=0.13, 100000=0.125 (USD)", Radiation Hardening=No, REACH SVHC="No SVHC", RoHS=Yes, Stock 1=8768, Supplier 1=Mouser, Weight=0.01lb, Width=4.6mm
U5: "Standard +9V 1A positive fixed voltage regulator in TO-220 housing", Case/Package=TO, Dropout Voltage=2V, Manufacturer 1=STMicroelectronics, Manufacturer Part Number 1=L7809CV, Max Input Voltage=35V, Max Operating Temperature=125°C, Max Output Current=1.5A, Min Input Voltage=11V, Min Operating Temperature=0°C, Min Output Voltage=9V, Package Quantity=50, Power Supply Rejection Ratio (PSRR)=55dB, Quiescent Current=8mA, Supplier Part Number 1=511-L7809CV, Tolerance=5%, Accuracy=2%, ComponentLink1Description=http://www.jameco.com/Jameco/Products/ProdDS/902071.pdf, ComponentLink1URL=http://www.jameco.com/Jameco/Products/ProdDS/902071.pdf, ComponentLink2Description=http://www.ti.com/lit/ds/symlink/lm7805c.pdf, ComponentLink2URL=http://www.ti.com/lit/ds/symlink/lm7805c.pdf, ComponentLink3Description=http://www.ti.com/general/docs/lit/getliterature.tsp?genericPartNumber=LM7815C&&fileType=pdf, ComponentLink3URL=http://www.ti.com/general/docs/lit/getliterature.tsp?genericPartNumber=LM7815C&&fileType=pdf, ComponentLink4Description=https://datasheet.ciiva.com/27055/1991694-27055797.pdf?src-supplier=Jameco, ComponentLink4URL=https://datasheet.ciiva.com/27055/1991694-27055797.pdf?src-supplier=Jameco, ComponentLink5Description=https://datasheet.ciiva.com/26331/179191-da-01-en-spannungsregler-l7809cv-to-220-stm-26331022.pdf?src-supplier=Conrad, ComponentLink5URL=https://datasheet.ciiva.com/26331/179191-da-01-en-spannungsregler-l7809cv-to-220-stm-26331022.pdf?src-supplier=Conrad, ComponentLink6Description=https://datasheet.ciiva.com/1511/1805459-1511921.pdf?src-supplier=Element14, ComponentLink6URL=https://datasheet.ciiva.com/1511/1805459-1511921.pdf?src-supplier=Element14, ComponentLink7Description=https://datasheet.ciiva.com/2044/cd00000444-2044161.pdf?src-supplier=Digi-Key, ComponentLink7URL=https://datasheet.ciiva.com/2044/cd00000444-2044161.pdf?src-supplier=Digi-Key, ComponentLink8Description=https://datasheet.ciiva.com/16393/cd00000444-16393733.pdf?src-supplier=Future+Electronics, ComponentLink8URL=https://datasheet.ciiva.com/16393/cd00000444-16393733.pdf?src-supplier=Future+Electronics, ComponentLink9Description=https://datasheet.ciiva.com/3224/cd00000444-3224953.pdf?src-supplier=Avnet, ComponentLink9URL=https://datasheet.ciiva.com/3224/cd00000444-3224953.pdf?src-supplier=Avnet, ComponentLink10Description=https://datasheet.ciiva.com/18404/70013895-18404043.pdf?src-supplier=Allied+Electronics, ComponentLink10URL=https://datasheet.ciiva.com/18404/70013895-18404043.pdf?src-supplier=Allied+Electronics, Description 1="STMICROELECTRONICS - L7809CV - IC, V REG +9.0V, 7809, TO-220-3", Height=14.9mm, Lead Free="Lead Free", Length=10.4mm, Mount="Through Hole", Nominal Output Voltage=9V, Number of Outputs=1, Number of Pins=3, Number of Regulators=1, Output Configuration=Positive, Output Current=1.5A, Output Type=Fixed,Adjustable, Output Voltage=9V, Packaging=Rail/Tube, Polarity=Positive, Pricing="1=0.45, 10=0.374, 50=0.374, 100=0.228, 1000=0.176, 2000=0.15, 10000=0.14, 25000=0.133, 50000=0.13, 100000=0.125 (USD)", Radiation Hardening=No, REACH SVHC="No SVHC", RoHS=Yes, Stock 1=8768, Supplier 1=Mouser, Weight=0.01lb, Width=4.6mm

## Free pads (board coordinates)
  round 4 hole 3: 2(119,49.64) 3(90,49.64) 4(90,20.64) 5(119,20.64)
  round 5 hole 2.6: 6(3.57,5.64) 7(3.57,94.36) 8(157.16,94.36) 9(157.16,5.64)

## Via types
v1: diameter 0.9, hole 0.5, Top Layer to Bottom Layer, 376 vias
v2: diameter 1.27, hole 0.711, Top Layer to Bottom Layer, 12 vias

## Nets (pads, with @x,y where several pads share a name; then routed paths per layer and width w, separated by ;. In a path a pad name is that pad's centre, name@x,y a point inside that pad or via, vN(x,y) a via of type N, cw(c..) or ccw(c..) an arc to the next point about the centre after c; other vN are vias at no path point)
3v3: J9.25 J9.26 | length 2.6
  Top Layer w1: J9.25 112.12,8.63 J9.26@112.25,8.5
+5: C7.1 C8.1 C31.2 C33.2 CN4.3 D1.A D2.A D3.A D4.A D5.A J10.25 R21.1 R23.2 U3.2 U3.4 U3.6 U3.8 U3.45 U4.3 | length 361
  Top Layer w0.254: U3.8 95.63,85.603 96.011,85.984 C7.1@96.249,85.984 ; U3.6 96.63,85.603 C7.1@96.249,85.984 ; U3.4 97.63,85.603 98.011,85.984 C8.1 ; C8.1@98.249,85.984 98.63,85.603 U3.2 98.63,82.07 99.45,81.25 U3.45 ; 103.661,91.515 98.638,86.492 98.638,86.365 98.257,85.984 C8.1 ; R21.1 112.016,79.984 ; C7.1@96.249,85.984 C8.1
  Top Layer w1: D5.A 5,24.847 3.613,26.234 3.613,32.484 ; D4.A 4.949,32.281 3.816,32.281 3.613,32.484 ; D3.A 3.883,39.73 3.613,40 ; D2.A 4.89,78.84 4.484,78.84 4.324,79 3.613,79 ; D1.A 4.949,86.281 3.816,86.281 3.613,86.484 ; CN4.3 40,86.96 40,97 ; R23.2 71.773,28.023 73.023,28.023 101.89,56.89 112.209,56.89 115,59.681 115,61.78 ; J10.25 115,61.78 ; v2(132.25,66.75) 127.28,61.78 115,61.78 ; C31.2 143.373,78.556 142.956,78.973 141.317,78.973 C33.2 141.175,78.965 140.184,78.965 U4.3 132.25,71.031 v2(132.25,71) 121,71 112.016,79.984 112.016,83.161 103.661,91.515 98.177,97 40,97 ; 3.613,32.484 3.613,40 ; 3.613,40 3.613,79 ; 3.613,79 3.613,86.484 ; 3.613,86.484 3.613,89.806 10.807,97 40,97
  Bottom Layer w1: v2(132.25,66.75) v2(132.25,71)
+9: C35.2 C37.2 R1.1 R14.1 R17.1 U5.3 | length 113
  Top Layer w1: R17.1 61.016,57.127 61.024,57.135 61.385,57.135 v2(62.75,58.5) 64.258,56.992 64.992,56.992 R14.1 ; R1.1 61.016,64.873 61.024,64.865 61.151,64.865 62.75,63.266 v2(62.75,61.75) ; R1.1@61.016,65.127 61.024,65.135 61.245,65.135 62.86,66.75 v2(128.25,66.75) ; v2(128.25,77) 128.25,78.781 U5.3 139.038,89.29 139.554,89.806 139.7,89.806 140.609,90.715 141.175,90.715 C37.2 141.575,90.79 142.059,90.306 C35.2
  Bottom Layer w1: v2(62.75,58.5) v2(62.75,61.75) ; v2(128.25,66.75) v2(128.25,77)
+12: C30.2 C32.2 C34.2 C36.2 D6.C J11.1 U4.1 U5.1 | length 30.9
  Top Layer w1: U4.1 140.184,71.035 141.175,71.035 C32.2 ; U5.1 139.894,83.075 141.175,83.075 C36.2 141.325,83.075 142.077,83.075 142.236,83.234 142.802,83.234 C34.2 ; C32.2@141.575,70.96 141.642,71.027 142.956,71.027 143.373,71.444 C30.2 ; C34.2 146.166,83.234 146.5,82.9 147.207,83.607 149.338,83.607 149.8,84.069 J11.1 ; C30.2@143.627,71.444 143.635,71.452 143.635,71.579 145.25,73.194 145.25,81.164 145.836,81.75 146.15,81.75 146.5,82.1 D6.C
-4v: J10.26
CS: CN1.4 J10.22 U3.41 | length 30.9
  Top Layer w0.254: U3.41 100.632,79.248 102.463,79.248 102.891,78.821 106.289,78.821 CN1.4 ; J10.22 108.052,60.252 108.052,61.683 109.97,63.601 110.601,63.601 v2(110.75,63.75)
  Bottom Layer w0.254: v2(110.75,63.75) 110.884,63.884 111.545,63.884 112.41,64.749 CN1.4
GND: C1.2 C5.2 C7.2 C8.2 C10.2 C11.1 C13.1 C14.2 C15.2 C16.2 C17.2 C18.2 C19.1 C19.2 C20.2 C21.2 C22.2 C23.2 C24.2 C25.2 C26.2 C27.2 C28.2 C29.2 C30.1 C31.1 C32.1 C33.1 C34.1 C35.1 C36.1 C37.1 CN4.1 CN7.1 D6.A J1.2 J1.3 J2.2 J3.2 J3.3 J3.4 J3.5 J4.2 J4.3 J5.2 J5.3 J6.2 J7.2 J7.3 J8.2 J8.3 J8.4 J8.5 J9.1 J9.2 J10.1 J10.2 J10.5 J10.6 J10.16 J11.2 pad.2 pad.3 pad.4 pad.5 pad.6 pad.7 pad.8 pad.9 Q1.2 Q2.2 Q3.2 Q4.2 R3.2 R8.2 R15.2 R16.1 R19.2 U1.2 U2.2 U3.1 U3.3 U3.5 U3.7 U3.9 U3.12 U3.15 U3.26 U3.27 U3.28 U3.29 U3.30 U3.31 U3.32 U3.33 U3.34 U3.35 U3.36 U3.44 U4.2 U5.2
  other v1: 125.479,4.521 40,5 45,5 55,5 60,5 65,5 70,5 75,5 80,5 85,5 90,5 95,5 100,5 105,5 110,5 115,5 120,5 130,5 135,5 140,5 145,5 150,5 5,10 50,10 55,10 60,10 65,10 70,10 75,10 120,10 125,10 130,10 5,15 95,15 100,15 110,15 115,15 120,15 125,15 130,15 5,20 10,20 15,20 25,20 30,20 35,20 40,20 45,20 50,20 55,20 60,20 65,20 70,20 75,20 80,20 85,20 95,20 115,20 125,20 130,20 20,25 25,25 35,25 40,25 45,25 50,25 55,25 60,25 65,25 70,25 85,25 90,25 120,25 125,25 130,25 5,30 10,30 15,30 20,30 25,30 80,30 85,30 125,30 130,30 20,35 25,35 30,35 35,35 40,35 45,35 50,35 55,35 60,35 65,35 70,35 75,35 130,35 5,37.5 10,37.5 15,37.5 20,40 25,40 30,40 35,40 40,40 55,40 60,40 65,40 70,40 75,40 80,40 125,40 130,40 135,40 140,40 145,40 150,40 155,40 130.479,44.521 5,45 10,45 15,45 20,45 25,45 30,45 35,45 40,45 45,45 50,45 55,45 60,45 65,45 70,45 75,45 80,45 85,45 120,45 125,45 135,45 140,45 145,45 155,45 135.479,49.521 5,50 10,50 15,50 20,50 25,50 40,50 65,50 70,50 75,50 80,50 85,50 115,50 125,50 130,50 140,50 145,50 150,50 155,50 52.25,52.5 57.5,52.5 61,53.5 5,55 10,55 15,55 20,55 25,55 30,55 35,55 45,55 62.5,55 65,55 70,55 75,55 80,55 85,55 90,55 95,55 110,55 115,55 120,55 125,55 130,55 135,55 140,55 145,55 155,55 56,55.5 69.5,58 80,59.75 5,60 10,60 15,60 20,60 25,60 30,60 35,60 40,60 50,60 75,60 120,60 125,60 130,60 135,60 140,60 145,60 150,60 155,60 45,60.5 57.75,61 61,61.5 66.75,63 54.25,64 57.75,64 5,65 10,65 15,65 20,65 25,65 30,65 35,65 65,65 70,65 75,65 80,65 85,65 90,65 95,65 100,65 115,65 120,65 125,65 135,65 140,65 145,65 155,65 43.5,67 46.5,67 5,70 10,70 15,70 20,70 25,70 40,70 45,70 55,70 60,70 80,70 95,70 100,70 115,70 150,70 155,70 78,71.25 99,72.5 85.75,73.25 96,73.25 5,75 10,75 15,75 20,75 25,75 30,75 35,75 40,75 45,75 50,75 85.25,75 102.5,75 115,75 125,75 130,75 155,75 91.75,75.5 81,75.75 85.5,77.75 94.25,77.75 97.5,77.75 76.25,78.5 81,79 20,80 25,80 30,80 35,80 40,80 45,80 65,80 94.25,80 97.5,80 115,80 120,80 125,80 135,80 150,80 155,80 85.25,80.25 80.75,81.5 78,82 106.75,82 109,82 94.25,82.25 97.5,82.25 85.25,82.75 106.75,84 80.75,84.25 10,85 15,85 20,85 25,85 30,85 35,85 60,85 65,85 115,85 125,85 130,85 85.25,85.75 76.75,89 10,90 15,90 20,90 25,90 30,90 35,90 45,90 55,90 60,90 65,90 85,90 93.25,90 95,90 96.75,90 98.25,90 110,90 115,90 120,90 125,90 130,90 135,90 145,90 15,95 20,95 25,95 30,95 35,95 45,95 50,95 55,95 60,95 65,95 80,95 85,95 90,95 95,95 105,95 110,95 115,95 120,95 125,95 130,95 135,95 140,95 145,95 150,95
LED_0: J9.12 R10.1 | length 144.5
  Top Layer w0.254: R10.1 14.516,79 v1(18,79)
  Bottom Layer w0.254: v1(18,79) 18,24 25.5,16.5 90.382,16.5 95.402,11.48 95.402,9.562 J9.12
LED_1: J9.11 R11.1 | length 101.5
  Top Layer w0.254: R11.1 16.991,39.984 v1(17,39.975)
  Bottom Layer w0.254: v1(17,39.975) 17,23.5 25.006,15.494 89.886,15.494 J9.11
LED_2: J9.10 R12.1 | length 96.1
  Top Layer w0.254: R12.1 14.516,32.5 v1(16,32.5)
  Bottom Layer w0.254: v1(16,32.5) 16,23 24.5,14.5 89.842,14.5 92.862,11.48 92.862,9.562 J9.10
LED_3: J9.9 R13.1 | length 84.3
  Top Layer w0.254: R13.1 14.619,24.984 15,24.603 v1(15,23.5)
  Bottom Layer w0.254: v1(15,23.5) 15,22.5 24,13.5 89.34,13.5 J9.9
MISO: CN1.3 J10.24 U3.39 | length 25.9
  Top Layer w0.254: U3.39 102.177,78.25 102.55,77.877 104.023,77.877 v2(106.3,75.6)
  Bottom Layer w0.254: v2(106.3,75.6) 106.429,75.471 107.099,75.471 CN1.3 109.87,63.23 110.8,62.3 110.8,60.46 J10.24
MOSI: CN1.2 J10.23 U3.40 | length 23.3
  Top Layer w0.254: U3.40 102.319,78.75 102.702,78.367 105.433,78.367 107.33,76.47 CN1.2
  Bottom Layer w0.254: CN1.2 107.33,64.03 J10.23
NetC1_1: C1.1 R1.2 U1.5 | length 4.1
  Top Layer w0.254: U1.5 57.1,63 C1.1 R1.2
NetC2_1: C2.1 C3.1 R9.2 U1.1 | length 9.3
  Top Layer w0.254: C2.1 49.032,65.016 R9.2 C3.1 53.34,65.356 53.834,65.356 54.808,66.33 56.242,66.33 56.646,65.926 56.771,65.926 56.95,65.747 U1.1
NetC2_2: C2.2 R2.1 R8.1 | length 4
  Top Layer w0.254: R2.1 C2.2
NetC3_2: C3.2 J2.1 J3.1 R9.1 U1.4 | length 165.9
  Top Layer w0.433: U1.4 53.134,62.85 C3.2 29.054,62.984 26.527,65.511 26.527,71.989 28.511,73.973 46.066,73.973 51.038,69 J2.1 ; J2.1@146.798,69 J3.1
NetC4_1: C4.1 J4.1 R16.2 | length 75.8
  Top Layer w0.433: v1(31,30) 69,30 73.75,34.75 73.75,59.25 73.025,59.975 R16.2 70.975,60 C4.1
  Bottom Layer w0.433: J4.1 v1(31,30)
NetC4_2: C4.2 R14.2 R15.1 U1.3 U2.3 | length 21.8
  Top Layer w0.254: U2.3 55.05,57.65 55.316,57.916 55.345,57.916 56,58.572 56,60 ; U1.3 55.119,65.082 55.119,64.197 55.286,64.029 55.292,64.029 56,63.321 56,60 ; R14.2 R15.1 ; C4.2 56,60
NetC5_1: C5.1 R17.2 U2.5 | length 4.1
  Top Layer w0.254: U2.5@57,54.75 58.734,54.75 C5.1 ; R17.2 59,56.984 C5.1@59,55
NetC6_1: C6.1 C9.1 R20.2 U2.1 | length 11.9
  Top Layer w0.254: C6.1 R20.2 52.984,57 C9.1 v1(53,59) ; U2.1 56.95,58.951 v1(57.006,59.006)
  Bottom Layer w0.254: v1(53,59) 56.999,59 v1(57.006,59.006)
NetC6_2: C6.2 R18.1 R19.1 | length 4
  Top Layer w0.254: R18.1 44.968,57 R19.1 46.952,56.968 C6.2
NetC9_2: C9.2 C19.3 R20.1 SW1.5 SW1.6 SW1.7 SW1.8 U2.4 | length 25.6
  Top Layer w0.254: SW1.8 SW1.7 SW1.6 SW1.5 54.86,49.81 55.05,50 ; R20.1 52.984,54.968 C9.2 53.134,54.85 U2.4 55.05,50 ; C19.3 60.028,50.5 59.528,50 55.05,50
NetC10_1: C10.1 U3.43 | length 3.5
  Top Layer w0.254: U3.43 101.871,80.25 102.341,80.72 102.341,81.006 103.191,81.857 C10.1
NetC11_2: C11.2 U3.11 | length 1.7
  Top Layer w0.254: U3.11 C11.2
NetC12_1: C12.1 U3.48 | length 6.3
  Top Layer w0.254: U3.48 100.63,85.326 103.188,87.884 C12.1
NetC12_2: C12.2 U3.47 | length 4.6
  Top Layer w0.254: U3.47@101.153,82.252 101.299,82.398 101.374,82.398 101.597,82.621 101.597,84.134 102.807,85.344 102.807,85.471 103.188,85.852 C12.2
NetC13_2: C13.2 U3.37 | length 3.6
  Top Layer w0.254: U3.37 100.914,77.25 100.916,77.248 C13.2
NetC14_1: C14.1 U3.46 | length 3.9
  Top Layer w0.254: U3.46 101.661,81.75 102.051,82.14 102.051,82.717 103.191,83.857 C14.1
NetC15_1: C15.1 SW1.1 | length 3.2
  Top Layer w0.254: C15.1 SW1.1
NetC16_1: C16.1 SW1.2 | length 3.2
  Top Layer w0.254: C16.1 SW1.2
NetC17_1: C17.1 SW1.3 | length 3.2
  Top Layer w0.254: C17.1 SW1.3
NetC18_1: C18.1 SW1.4 | length 3.2
  Top Layer w0.254: C18.1 SW1.4
NetC20_1: C20.1 CN6.1 U3.25 | length 8.3
  Top Layer w0.254: CN6.1 88.918,70.452 89.693,70.452 92.614,73.373 C20.1 92.614,73.627 93.63,74.643 U3.25
NetC21_1: C21.1 CN5.2 U3.23 | length 49.5
  Top Layer w0.254: CN5.2 59.26,74.7 v2(59.3,74.7) ; v2(62.3,72) 62.413,72 64.113,70.3 78.978,70.3 84.216,75.538 C21.1 89.693,76.75 90.693,77.75 U3.23
  Bottom Layer w0.254: v2(59.3,74.7) 62,72 v2(62.3,72)
NetC22_1: C22.1 CN4.2 U3.21 | length 55.2
  Top Layer w0.254: CN4.2 56.212,73.288 77.258,73.288 81.582,77.612 82.705,77.612 84.216,79.123 C22.1 89.26,79.25 89.76,78.75 U3.21
NetC23_1: C23.1 CN3.1 U3.19 | length 21.8
  Top Layer w0.254: CN3.1 78.65,80.5 80.9,82.75 83.216,82.75 C23.1 88.625,81.75 90.625,79.75 U3.19
NetC24_1: C24.1 CN2.1 R22.1 U3.17 | length 27.5
  Top Layer w0.254: CN2.1 72.79,92.25 R22.1 84.216,88.434 C24.1 89.75,84.25 90.454,83.546 90.454,81.688 91.39,80.752 U3.17@91.607,80.752
NetC25_1: C25.1 CN6.2 U3.24 | length 9.7
  Top Layer w0.254: CN6.2 88.661,73.631 C25.1 89.26,75.17 91.34,77.25 U3.24
NetC26_1: C26.1 CN5.1 U3.22 | length 51.1
  Top Layer w0.254: CN5.1 64.303,74.737 v2(64.46,74.737) ; v2(67,72) 78.898,72 83.216,76.318 83.216,77.214 84.047,78.046 84.546,78.046 85.112,78.612 87.799,78.612 88.153,78.258 88.28,78.258 88.661,77.877 C26.1 89.693,77.75 90.193,78.25 U3.22
  Bottom Layer w0.254: v2(64.46,74.737) 67,72.197 v2(67,72)
NetC27_1: C27.1 CN3.2 U3.20 | length 22.8
  Top Layer w0.254: CN3.2 75.52,75.42 80.534,80.434 84.364,80.434 85.042,81.112 87.799,81.112 88.153,80.758 88.28,80.758 88.661,80.377 C27.1 89.26,80.25 90.26,79.25 U3.20
NetC28_1: C28.1 CN2.2 U3.18 | length 23.5
  Top Layer w0.254: CN2.2 76.572,83.388 84.818,83.388 85.042,83.612 87.799,83.612 88.153,83.258 88.28,83.258 88.661,82.877 C28.1 89.851,82.75 90,82.601 90,81.5 91.248,80.252 92.128,80.252 U3.18
NetC29_1: C29.1 R22.2 U3.16 | length 16
  Top Layer w0.254: U3.16 91.534,81.25 91.054,81.73 91.054,84.846 90.45,85.45 88.861,85.45 C29.1 88.661,87.811 R22.2
NetCN7_2: CN7.2 R23.1 | length 6.3
  Top Layer w1: R23.1 77.507,25.984 77.721,25.77 CN7.2
NetD1_C: D1.C R3.1 | length 3.6
  Top Layer w0.254: D1.C 5.254,88.516 R3.1
NetD2_C: D2.C R4.1 | length 3.6
  Top Layer w0.254: D2.C 5.254,81.016 R4.1
NetD3_C: D3.C R5.1 | length 3.6
  Top Layer w0.254: D3.C 5.254,42.016 R5.1
NetD4_C: D4.C R6.1 | length 3.6
  Top Layer w0.254: D4.C 5.254,34.516 R6.1
NetD5_C: D5.C R7.1 | length 3.6
  Top Layer w0.254: D5.C 5.254,27.016 R7.1
NetJ1_1: J1.1 R2.2 | length 13.7
  Top Layer w0.433: v1(31,70) 36.111,70 40.984,65.127 R2.2
  Bottom Layer w0.433: J1.1 v1(31,70)
NetJ5_1: J5.1 R18.2 | length 14.5
  Top Layer w0.433: v1(31,50) 33.984,50 40.566,56.582 40.693,56.582 40.984,56.873 R18.2
  Bottom Layer w0.433: J5.1 v1(31,50)
NetJ6_1: J6.1 J7.1 J8.1 | length 166.6
  Top Layer w0.433: v1(31,10) 44.019,10 51.006,3.014 120.914,3.014 128.514,10.614 128.514,44.494 135.019,51 J8.1
  Bottom Layer w0.433: J7.1 v1(31,10)
NetQ1_1: Q1.1 R10.2 | length 2.9
  Top Layer w0.254: Q1.1 12.55,79.05 12.823,79.323 12.823,79.339 13.992,80.508 13.992,80.635 14.373,81.016 R10.2
NetQ1_3: Q1.3 R4.2 | length 2.5
  Top Layer w0.254: R4.2 9.484,78.984 10.177,79.677 10.177,79.727 10.45,80 Q1.3
NetQ2_1: Q2.1 R11.2 | length 2.9
  Top Layer w0.254: Q2.1 12.55,40.05 12.823,40.323 12.823,40.339 13.992,41.508 13.992,41.635 14.373,42.016 R11.2
NetQ2_3: Q2.3 R5.2 | length 2.5
  Top Layer w0.254: R5.2 9.484,39.984 10.177,40.677 10.177,40.727 10.45,41 Q2.3
NetQ3_1: Q3.1 R12.2 | length 2.9
  Top Layer w0.254: Q3.1 12.55,32.55 12.823,32.823 12.823,32.839 13.992,34.008 13.992,34.135 14.373,34.516 R12.2
NetQ3_3: Q3.3 R6.2 | length 2.5
  Top Layer w0.254: R6.2 9.484,32.484 10.177,33.177 10.177,33.227 10.45,33.5 Q3.3
NetQ4_1: Q4.1 R13.2 | length 2.9
  Top Layer w0.254: Q4.1 12.55,25.05 12.823,25.323 12.823,25.339 13.992,26.508 13.992,26.635 14.373,27.016 R13.2
NetQ4_3: Q4.3 R7.2 | length 2.5
  Top Layer w0.254: R7.2 9.484,24.984 10.177,25.677 10.177,25.727 10.45,26 Q4.3
NetR21_2: R21.2 U3.42 | length 2.7
  Top Layer w0.254: U3.42 102.958,79.75 R21.2
NetU3_13: U3.13 U3.14 | length 0.6
  Top Layer w0.254: U3.14@92,82.252 92,82.748 92.002,82.75 U3.13
SCK: CN1.1 J10.21 U3.38 | length 18.9
  Top Layer w0.254: U3.38@101.153,77.75 102.035,77.75 104.79,74.995 CN1.1
  Bottom Layer w0.254: CN1.1 104.79,64.03 J10.21
pads on no net: "J2. " "J6. " "U4. " "U5. " J9.3 J9.4 J9.5 J9.6 J9.7 J9.8 J9.13 J9.14 J9.15 J9.16 J9.17 J9.18 J9.19 J9.20 J9.21 J9.22 J9.23 J9.24 J10.3 J10.4 J10.7 J10.8 J10.9 J10.10 J10.11 J10.12 J10.13 J10.14 J10.15 J10.17 J10.18 J10.19 J10.20 J11.3 U3.10

## Polygon pours and split planes (outlines as drawn)
GND on Top Layer "GND_L01_P000" (solid, remove dead copper, pour order 0): -1,101 161,101 161,-1 -1,-1
GND on Bottom Layer "GND_L02_P001" (solid, remove dead copper, pour order 1): -3,103 163,103 163,-3 -3,-3

## Silkscreen, mask and mechanical layers (free items; w line width, h text height)
Top Overlay:
  lines w0.254: 86.5,17.14 86.5,30.64 100,17.14 86.5,17.14 ; 86.5,39.64 86.5,52.64 86.5,53.14 100,53.14 86.5,39.64 ; 109,17.14 122.5,30.64 122.5,17.14 109,17.14 ; 109,53.14 122.5,39.64 122.5,53.14 109,53.14
  text "+12v" at 148.489,76.75 h5
  text "XTAL" at 132.999,61.5 h5
  text "OUT" at 134.935,43.354 h5
  text "+" at 76.944,27.199 h5
  text "-" at 77.396,19.288 h5
  text "ELD - 2518  / QCM Temperature Compensation V2.0 /  / Flint Wardenaar wardenaar@physics.leidenuniv.nl / 5/10/2026" at 25.75,3.25 h3
  text "https://github.com/Flint2082/QCM_red_pitaya" at 8.311,2.75 h1.5
Bottom Overlay:
  lines w0.254: 65,5.14 160,5.14 160,65.14 65,65.14 65,5.14
  text "+12v" at 158.511,76.75 h5
  text "XTAL" at 158.751,58.75 h5
  text "OUT" at 158.315,39.554 h5
Mechanical 1:
  lines w0.2: 0,0 160,0 ; 0,20 0,100 160,100 160,42
  lines w0.254: 104.5,14.125 83.5,35.125 104.5,56.125 ; 104.5,14.125 125.5,35.125 104.5,56.125 ; 104.5,14.125 104.5,14.125 ; 104.5,56.125 104.5,56.125
  text ".Pcb_File_Name_No_Path" at 0,-2.5 h1.52
Mechanical 9:
  lines w0.254: 160,10.14 135,10.14 135,37.14 160,37.14 ; 160,15 160,0 0,0 0,100 160,100 160,42

## Text inside footprints (layer, text, board x,y; h text height)
CN1: Top Overlay "4" at 114.315,72.065 h1.02; Top Overlay "1" at 102.625,72.1 h1.02; Mechanical 8 "1" at 102.625,72.1 h1.02; Mechanical 8 "4" at 114.315,72.065 h1.02
CN4: Top Overlay "3" at 44.025,80.555 h1.02 r270; Top Overlay "1" at 44.025,89.7 h1.02 r270; Mechanical 8 "1" at 44.025,89.7 h1.02 r270; Mechanical 8 "3" at 44.025,80.555 h1.02 r270
CN6: Top Overlay "1" at 90.6,71.425 h1.02 r180; Top Overlay "2" at 84.127,71.425 h1.02 r180; Mechanical 8 "2" at 84.127,71.425 h1.02 r180; Mechanical 8 "1" at 90.6,71.425 h1.02 r180
CN7: Mechanical 8 "2" at 78.525,27.573 h1.02 r90; Mechanical 8 "1" at 78.525,21.1 h1.02 r90
D1: Top Overlay "C" at 3.095,89.659 h0.69 r270; Mechanical 8 "C" at 3.095,89.659 h0.69 r270
D2: Top Overlay "C" at 3.095,82.159 h0.69 r270; Mechanical 8 "C" at 3.095,82.159 h0.69 r270
D3: Top Overlay "C" at 3.095,43.159 h0.69 r270; Mechanical 8 "C" at 3.095,43.159 h0.69 r270
D4: Top Overlay "C" at 3.095,35.659 h0.69 r270; Mechanical 8 "C" at 3.095,35.659 h0.69 r270
D5: Top Overlay "C" at 3.095,28.159 h0.69 r270; Mechanical 8 "C" at 3.095,28.159 h0.69 r270